# Allegro board EMBL51537_SC_BOARD.brd
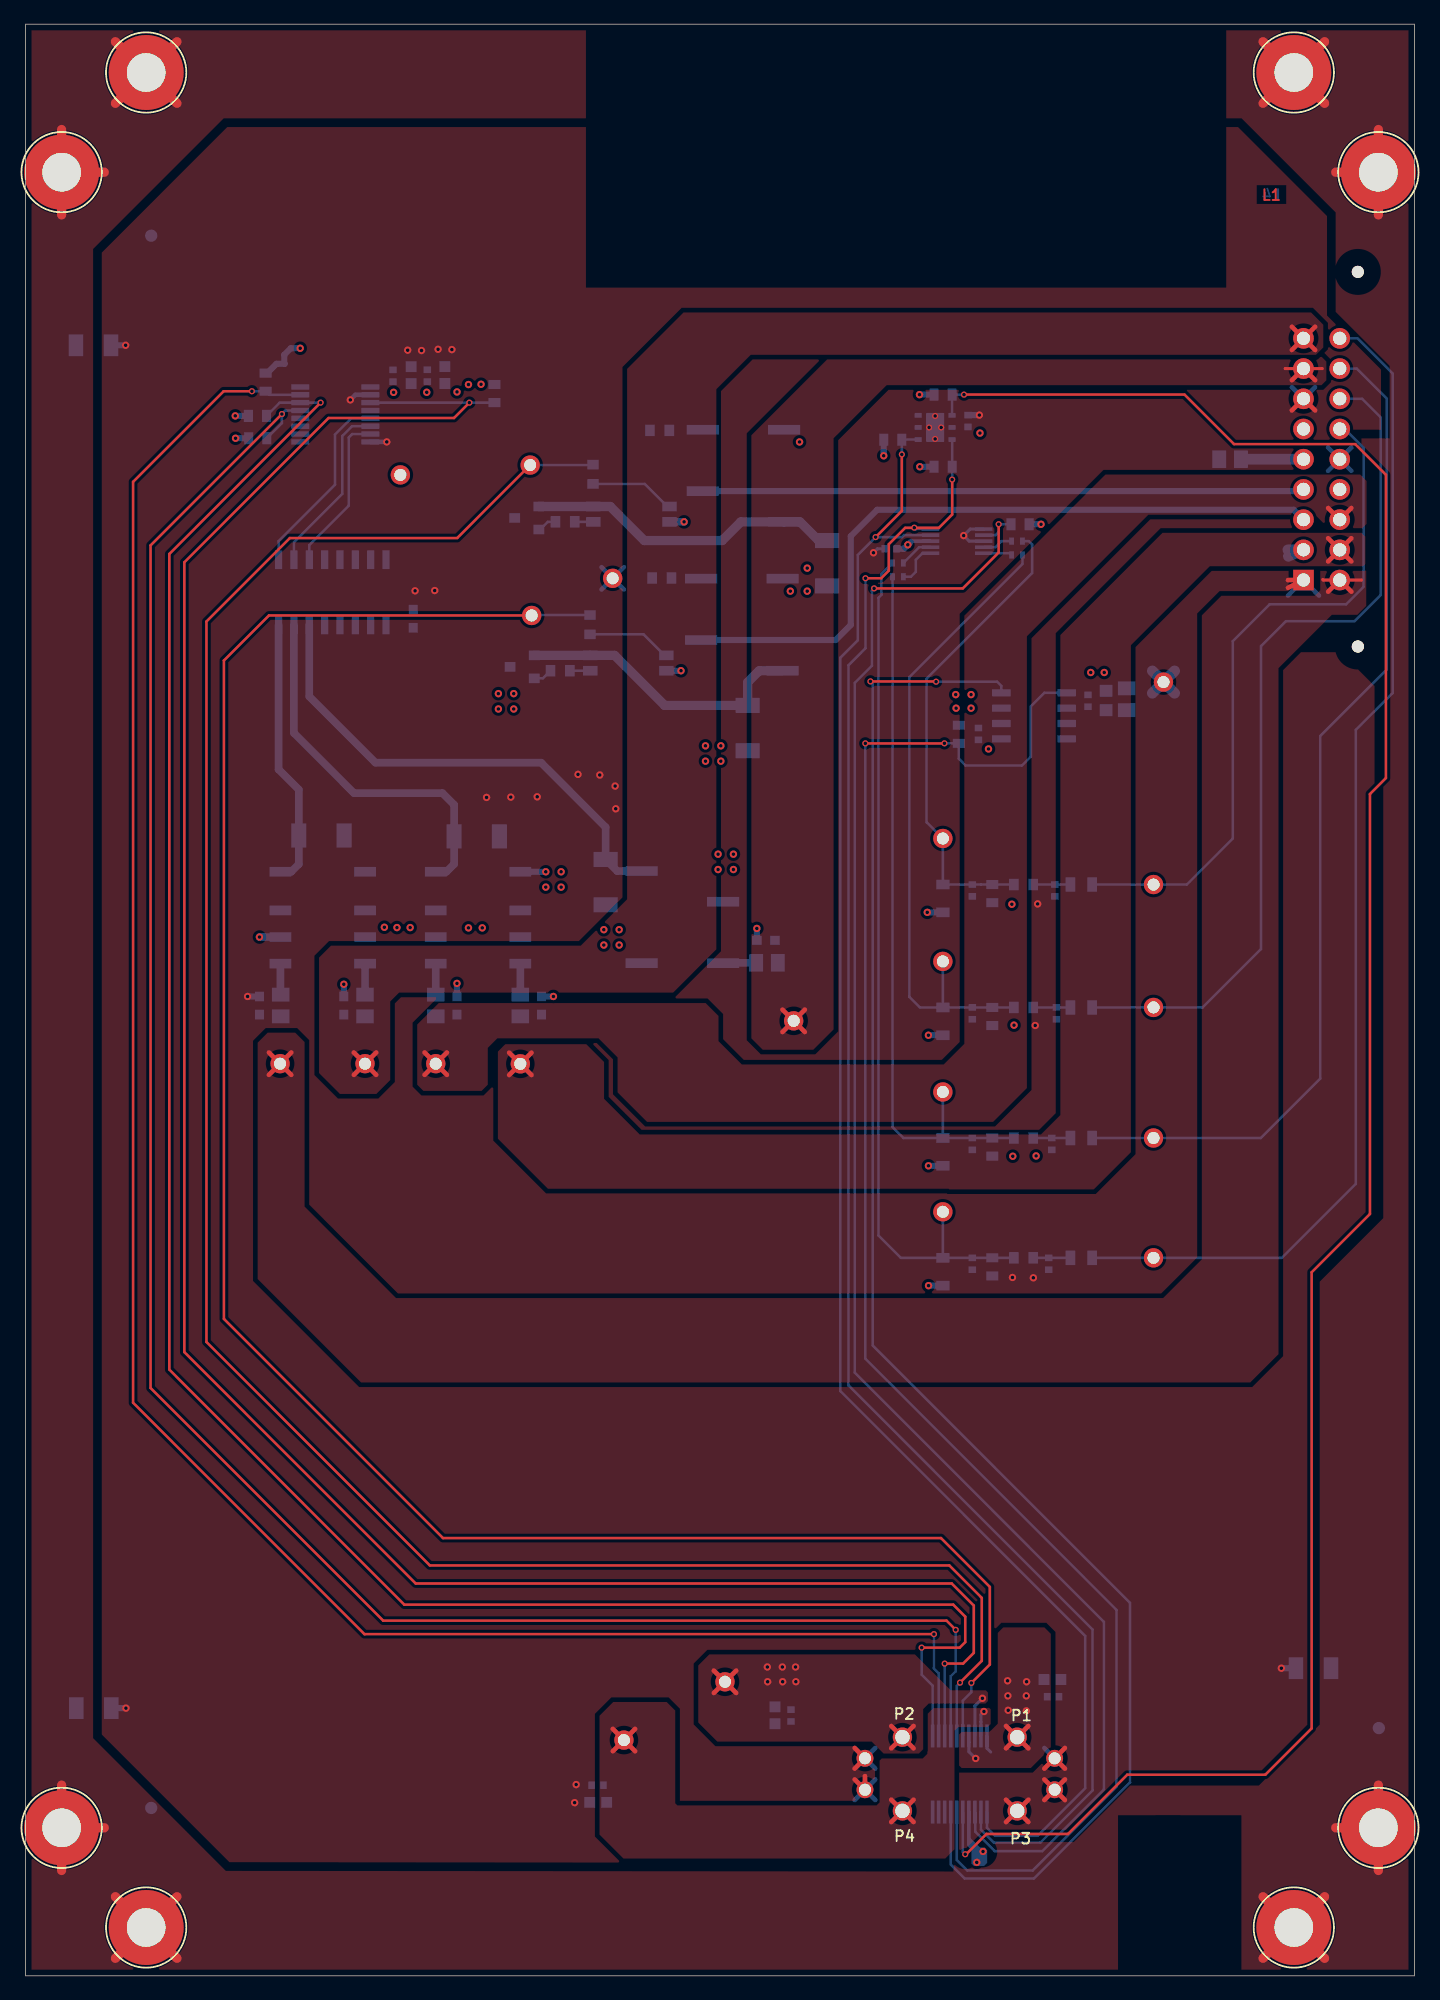
[diagram p0: board, top side]
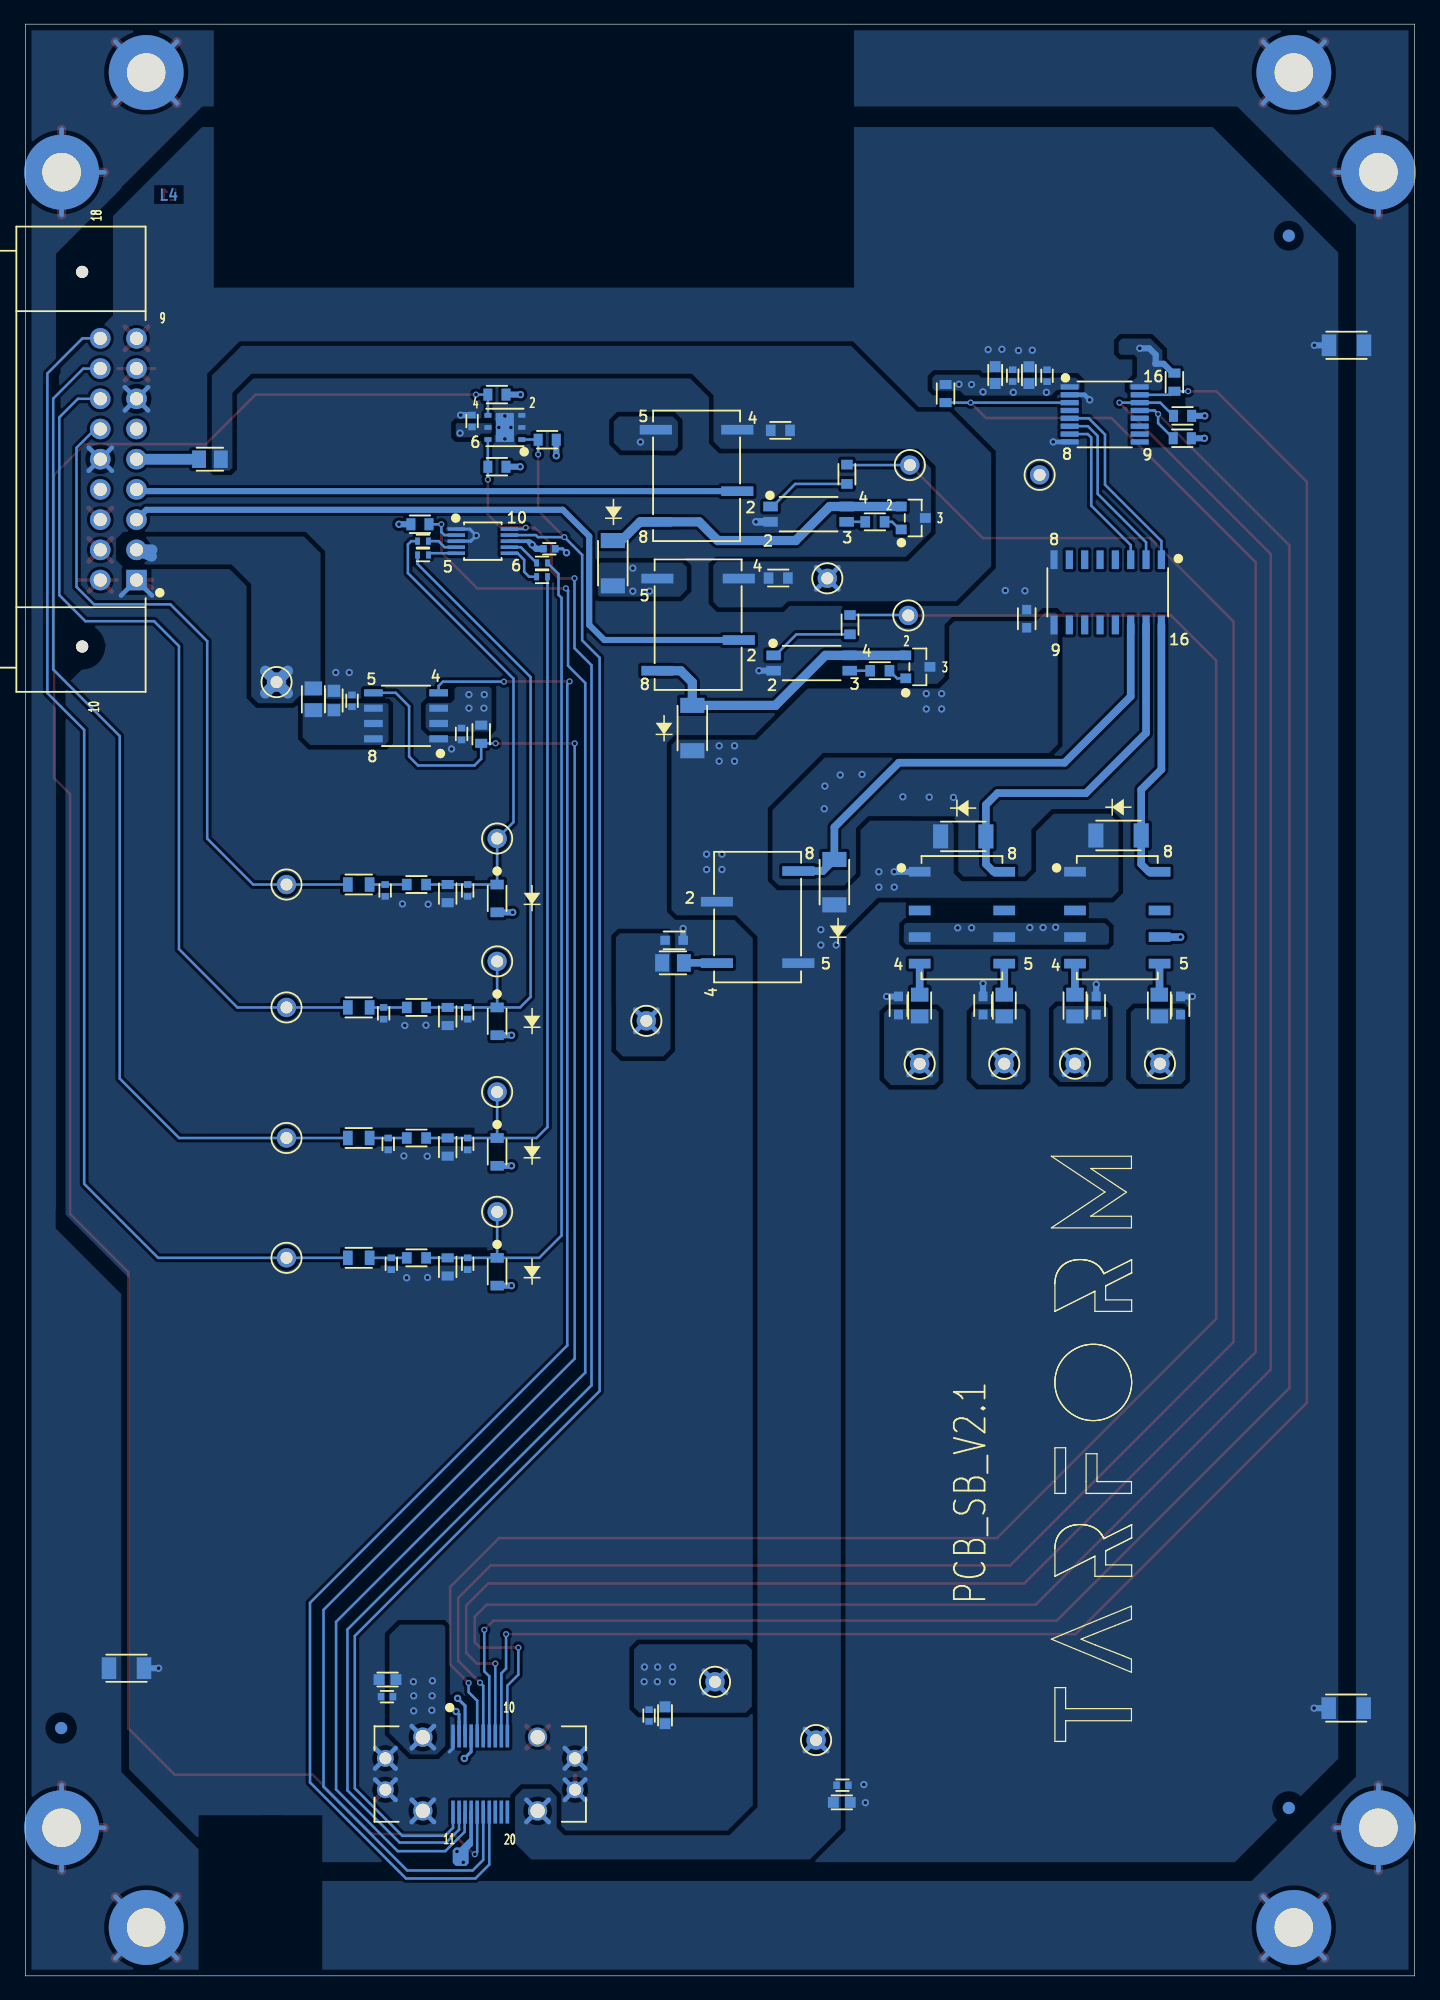
[diagram p1: board, bottom side, seen from below]

Outline 115 x 161.5 mm; copper layers: TOP, L2_PWR, L3_GND, BOTTOM. Coordinates in mm from the lower left corner of the outline.
Outline path: 0,161.5 0,0 115,0 115,161.5 0,161.5

## Design rules (mm)
constraint set DEFAULT: min track width 0.21
net group I2C_ANI0_IC: nets I2C_ANI0_IC N06583
net group I2C_ANI1_IC: nets I2C_ANI1_IC N06579
net group I2C_ANI2_IC: nets I2C_ANI2_IC N06575
net group I2C_ANI3_IC: nets I2C_ANI3_IC N06560
net group POWER: nets HV_GND ISO_RELAY1_IN1 ISO_RELAY2_IN1

## Placement (name value [footprint] x y rotation side)
C1  0.1uF  [CAPC1005X55N_A]  78.89 102.77 270 bottom
C2  0.1uF  [CAPC1005X55N_A]  87.96 105.51 90 bottom
C3  22uF  [CAPC1608X80N_A]  89.46 105.54 90 bottom
C4  0.1uF  [CAPC1005X55N_A]  30.43 132.41 90 bottom
C5  1uF  [CAPC1608X90N_A]  31.93 132.46 90 bottom
C6  0.1uF  [CAPC1608X90N]  32.11 112.3 270 bottom
C7  0.1uF  [CAPC1005X55N_A]  71.63 118.09 180 bottom
C8  0.1uF  [CAPC1005X55N_A]  78.03 128.66 90 bottom
C9  0.1uF  [CAPC1005X55N_A]  47.36 15.77 180 bottom
C10  1uF  [CAPC1608X90N_A]  47.42 14.35 180 bottom
C11  0.1uF  [CAPC1005X55N_A]  63.38 21.54 270 bottom
C12  1uF  [CAPC1608X90N_A]  62.05 21.56 270 bottom
C13  0.1uF  [CAPC1005X55N_A]  85.07 23.1 0 bottom
C14  1uF  [CAPC1608X90N_A]  85.02 24.52 0 bottom
C15  0.1uF  [CAPC1608X90N]  42.73 80.29 270 bottom
C16  0.1uF  [CAPC1608X90N]  35.73 80.29 270 bottom
C17  0.1uF  [CAPC1608X90N]  61.3 85.69 0 bottom
C18  0.1uF  [CAPC1005X55N_A]  85.22 89.82 270 bottom
C19  0.1uF  [CAPC1005X55N_A]  78.39 89.82 270 bottom
C20  0.1uF  [CAPC1005X55N_A]  85.35 79.65 270 bottom
C21  0.1uF  [CAPC1005X55N_A]  78.39 79.65 270 bottom
C22  DNP  [CAPC1005X55N_A]  84.96 68.84 270 bottom
C23  DNP  [CAPC1005X55N_A]  78.39 68.84 270 bottom
C24  DNP  [CAPC1005X55N_A]  84.71 58.92 270 bottom
C25  DNP  [CAPC1005X55N_A]  78.39 58.92 270 bottom
C26  0.1uF  [CAPC1608X90N]  26.36 80.29 270 bottom
C27  0.1uF  [CAPC1608X90N]  19.38 80.29 270 bottom
C30  1nF  [CAPC3216X180N_D]  5.64 134.93 0 bottom
C31  DNP  [CAPC3216X180N_D]  5.66 22.15 0 bottom
C32  DNP  [CAPC3216X180N_D]  106.63 25.46 180 bottom
C33  0.1uF  [CAPC1005X55N_A]  33.27 132.41 90 bottom
C34  1uF  [CAPC1608X90N_A]  34.72 132.47 90 bottom
D18  RRE07VTM6SFHTR  [SODFL2514X80N_2K]  75.95 89.15 270 bottom
D19  RRE07VTM6SFHTR  [SODFL2514X80N_2K]  75.95 78.99 270 bottom
D20  DNP  [SODFL2514X80N_2K]  75.95 68.18 270 bottom
D21  DNP  [SODFL2514X80N_2K]  75.95 58.26 270 bottom
D22  LL4148-GS08  [DIOMELF3515N]  59.79 103.26 90 bottom
D23  LL4148-GS08  [DIOMELF3515N]  66.37 116.9 90 bottom
D24  LL4148-GS08  [DIOMELF3515N]  24.51 94.37 180 bottom
D25  LL4148-GS08  [DIOMELF3515N]  37.36 94.29 180 bottom
D26  LL4148-GS08  [DIOMELF3515N]  48.03 90.5 90 bottom
J1  FX23-20S-0.5SV  [HIROSE_FX23-20S-0P5SV]  79.6 19.85 180 bottom
J2  MX23A18NF1  [JAE_MX23A18NF1]  105.8 115.5 270 bottom
L16  BLM21SP601SH1D  [INDC2012X105N]  99.73 125.5 0 bottom
L18  MPZ2012S102AT000  [FB_MPZ2012S300ATD25]  87.41 90.31 180 bottom
L19  MPZ2012S102AT000  [FB_MPZ2012S300ATD25]  87.41 80.14 180 bottom
L20  MPZ2012S102AT000  [FB_MPZ2012S300ATD25]  87.41 69.33 180 bottom
L21  MPZ2012S102AT000  [FB_MPZ2012S300ATD25]  87.41 59.41 180 bottom
L22  BLM21SP601SH1D  [INDC2012X105N]  91.16 105.64 90 bottom
L23  BLM21AG121SZ1D  [INDC2012X105N]  40.97 80.29 270 bottom
L24  BLM21AG121SZ1D  [INDC2012X105N]  33.97 80.29 270 bottom
L25  BLM21AG121SZ1D  [INDC2012X105N]  21.14 80.29 270 bottom
L26  BLM21AG121SZ1D  [INDC2012X105N]  28.12 80.29 270 bottom
L27  BLM21AG121SZ1D  [INDC2012X105N]  61.39 83.82 0 bottom
MH1  Mounting hole  [MTG320_620]  3 149.25 270 top
MH2  Mounting hole  [MTG320_620]  112 149.25 270 top
MH3  Mounting hole  [MTG320_620]  3 12.25 270 top
MH4  Mounting hole  [MTG320_620]  112 12.25 270 top
MH5  Mounting hole  [MTG320_620]  10 157.5 270 top
MH6  Mounting hole  [MTG320_620]  105 157.5 270 top
MH7  Mounting hole  [MTG320_620]  10 4 270 top
MH8  Mounting hole  [MTG320_620]  105 4 270 top
NOREF  -  []  86.1 20.65 0 top
NOREF#2  -  []  114.26 151.38 0 top
NOREF#3  -  []  12.26 159.63 0 top
NOREF#4  -  []  75.95 88 90 top
NOREF#5  -  []  0 161.5 0 top
NOREF#6  -  []  76.7 81.54 0 top
NOREF#7  -  []  62.81 120.32 90 top
NOREF#8  -  []  50.79 103.81 0 top
NOREF#9  -  []  3 12.25 90 top
NOREF#10  -  []  78.8 59.31 90 top
NOREF#11  -  []  66.51 106.41 90 top
NOREF#12  -  []  114.26 14.37 0 top
NOREF#13  -  []  21.12 83.76 0 top
NOREF#14  -  []  75.1 13.55 0 top
NOREF#15  -  []  70.66 126.58 90 top
NOREF#16  -  []  75.95 57.11 90 top
NOREF#17  -  []  27.97 92.66 0 top
NOREF#18  -  []  55.71 113.61 0 top
NOREF#19  -  []  86.1 12.75 90 top
NOREF#20  -  []  51.02 83.8 90 top
NOREF#21  -  []  85.2 15.4 90 top
NOREF#22  -  []  72.6 13.65 0 top
NOREF#23  -  []  108.8 125.5 0 top
NOREF#24  -  []  123.05 98.6 90 top
NOREF#25  -  []  56.07 122.86 90 top
NOREF#26  -  []  78.8 80.04 90 top
NOREF#27  -  []  21.12 83.76 90 top
NOREF#28  -  []  33.97 88.16 90 top
NOREF#29  -  []  104.35 108.25 0 top
NOREF#30  -  []  12.26 6.12 0 top
NOREF#31  -  []  21.27 92.66 90 top
NOREF#32  -  []  132.5 119.75 0 top
NOREF#33  -  []  33.97 83.76 0 top
NOREF#34  -  []  78.8 69.23 90 top
NOREF#35  -  []  70.66 126.58 0 top
NOREF#36  -  []  76.7 70.73 0 top
NOREF#37  -  []  40.82 92.66 0 top
NOREF#38  -  []  76.7 60.81 0 top
NOREF#39  -  []  75.95 67.03 90 top
NOREF#40  -  []  34.12 92.66 0 top
NOREF#41  -  []  76.7 91.7 0 top
NOREF#42  -  []  73.91 127.13 90 top
NOREF#43  -  []  105.8 125.5 90 top
NOREF#44  -  []  78.8 90.21 90 top
NOREF#45  -  []  21.27 92.66 0 top
NOREF#46  -  []  50.79 93.01 90 top
NOREF#47  -  []  55.94 110.54 90 top
NOREF#48  -  []  62.68 108 90 top
NOREF#49  -  []  112 12.25 90 top
NOREF#50  -  []  75.95 77.83 90 top
NOREF#51  -  []  62.68 108 90 top
NOREF#52  -  []  10 4 90 top
NOREF#53  -  []  62.81 120.32 90 top
NOREF#54  -  []  33.97 83.76 90 top
NOREF#55  -  []  55.84 125.93 0 top
NOREF#56  -  []  57.76 88.88 90 top
NOREF#57  -  []  110.3 110 90 top
NOREF#58  -  []  105.05 144.75 0 top
NOREF#59  -  []  115 0 90 top
NOREF#60  -  []  73.91 129.13 0 top
NOREF#61  -  []  72.6 13.65 90 top
NOREF#62  -  []  21.12 85.96 90 top
NOREF#63  -  []  5.26 151.38 0 top
NOREF#64  -  []  57.76 83.8 90 top
NOREF#65  -  []  75.1 13.55 90 top
NOREF#66  -  []  138.85 108.25 90 top
NOREF#67  -  []  78.6 19.85 0 top
NOREF#68  -  []  21.12 88.16 90 top
NOREF#69  -  []  107.26 159.63 0 top
NOREF#70  -  []  108.8 135.5 90 top
NOREF#71  -  []  34.12 92.66 90 top
NOREF#72  -  []  5.26 14.37 0 top
NOREF#73  -  []  33.97 85.96 90 top
NOREF#74  -  []  107.26 6.12 0 top
NOREF#75  -  []  10 157.5 0 top
NOREF#76  -  []  105.8 128 90 top
NOREF#77  -  []  66.64 118.73 90 top
NOREF#78  -  []  77.35 16.7 0 top
NOREF#79  -  []  3 149.25 0 top
NOREF#80  -  [unnamed#2]  10.42 144 262.9 bottom
NOREF#81  -  [unnamed#2]  112.04 20.5 183.8 bottom
NOREF#82  -  [unnamed#2]  10.42 13.89 262.9 bottom
Q1  TLX9000(TPL,F  [OPTO_TLP293_BL-TPL_E]  49.91 108.63 270 bottom
Q2  TLX9000(TPL,F  [OPTO_TLP293_BL-TPL_E]  50.17 120.95 270 bottom
Q3  MMBT3904-TP  [SOT95P237X122-3N_OSI]  41.12 108.32 270 bottom
Q4  MMBT3904-TP  [SOT95P237X122-3N_OSI]  41.5 120.64 270 bottom
R1  DNP  [RESC1608X55N_B]  77.27 102.74 270 bottom
R2  10K  [RESC1608X55N_B]  19.21 129.09 0 bottom
R3  10K  [RESC1608X55N_B]  19.89 131.87 270 bottom
R8  10K  [RESC1608X55N_B]  71.8 127.11 0 bottom
R9  10K  [RESC1608X55N_B]  75.97 124.88 0 bottom
R10  10K  [RESC1608X55N_B]  82.34 120.12 180 bottom
R11  0E  [RESC1005X40N_A]  82.09 118.72 0 bottom
R12  0E  [RESC1005X40N_A]  82.09 117.58 0 bottom
R13  0E  [RESC1005X40N_A]  72.23 115.78 180 bottom
R14  0E  [RESC1005X40N_A]  72.23 116.92 180 bottom
R15  10K  [RESC1608X55N_B]  75.97 130.85 180 bottom
R16  DNP  [RESC1608X55N_A]  52.5 127.89 180 bottom
R17  1k  [RESC1608X55N_A]  46.74 111.81 90 bottom
R18  DNP  [RESC1608X55N_A]  52.68 115.67 0 bottom
R19  1k  [RESC1608X55N_A]  46.99 124.25 90 bottom
R28  10K  [RESC1608X55N_B]  19.23 127.24 0 bottom
R29  10K  [RESC1608X55N_B]  38.83 130.93 270 bottom
R30  47K  [RESC1608X55N_A]  82.63 90.31 180 bottom
R31  10K  [RESC1608X55N_B]  80.04 89.56 270 bottom
R32  47K  [RESC1608X55N_A]  82.63 80.14 180 bottom
R33  10K  [RESC1608X55N_B]  80.04 79.39 270 bottom
R34  DNP  [RESC1608X55N_A]  82.63 69.33 180 bottom
R35  DNP  [RESC1608X55N_B]  80.04 68.58 270 bottom
R36  DNP  [RESC1608X55N_A]  82.63 59.41 180 bottom
R37  DNP  [RESC1608X55N_B]  80.04 58.66 270 bottom
R38  1k2  [RESC1608X55N_A]  44.27 108 0 bottom
R39  1k2  [RESC1608X55N_A]  44.68 120.32 0 bottom
TP1  T POINT R  [TPC160H100]  94.21 107.06 180 bottom
TP2  T POINT R  [TPC160H100]  57.91 24.33 180 bottom
TP3  T POINT R  [TPC160H100]  49.55 19.51 90 bottom
TP4  T POINT R  [TPC160H100]  31.04 124.2 180 bottom
TP5  T POINT R  [TPC160H100]  28.12 75.48 180 bottom
TP6  T POINT R  [TPC160H100]  40.97 75.47 180 bottom
TP7  T POINT R  [TPC160H100]  63.6 79.03 270 bottom
TP8  T POINT R  [TPC160H100]  21.08 75.48 0 bottom
TP9  T POINT R  [TPC160H100]  33.97 75.48 0 bottom
TP10  T POINT R  [TPC160H100]  93.39 90.31 180 bottom
TP11  T POINT R  [TPC160H100]  93.39 80.14 180 bottom
TP12  T POINT R  [TPC160H100]  93.39 69.33 180 bottom
TP13  T POINT R  [TPC160H100]  93.39 59.41 180 bottom
TP14  T POINT R  [TPC160H100]  75.95 94.12 180 bottom
TP15  T POINT R  [TPC160H100]  75.95 83.95 180 bottom
TP16  T POINT R  [TPC160H100]  75.95 73.14 180 bottom
TP17  T POINT R  [TPC160H100]  75.95 63.22 180 bottom
TP18  T POINT R  [TPC160H100]  48.62 115.64 180 bottom
TP19  T POINT R  [TPC160H100]  41.91 112.57 180 bottom
TP20  T POINT R  [TPC160H100]  41.79 125.02 180 bottom
U1  TPS2024IDRQ1  [SOIC127P600X175-8N_TI]  83.49 104.27 90 bottom
U2  TCA6408AQPWRQ1  [TSSOP65P640X120-16N_B]  25.66 129.21 180 bottom
U3  G6K-2F-Y-DC12  [RELAY_G6K-2F-Y-DC12]  24.62 87.56 270 bottom
U4  G6K-2F-Y-DC12  [RELAY_G6K-2F-Y-DC12]  37.47 87.56 270 bottom
U5  TPL7407LADR  [SOIC127P600X175-16N_TI]  25.41 114.48 0 bottom
U6  G6L-1F-DC12  [RELAY_G6L-1F-DC12]  54.39 87.61 270 bottom
U11  ADS1015IDGSR  [VSSOP50P490X110-10N]  77.13 118.72 180 bottom
U12  HDC2021DEBT  [WSON100P300X300X92-7N]  75.31 128.13 0 bottom
U13  G6L-1F-DC12  [RELAY_G6L-1F-DC12]  59.31 111.81 90 bottom
U14  G6L-1F-DC12  [RELAY_G6L-1F-DC12]  59.44 124.13 90 bottom

## Library data of the parts
C1 C2 C4 C7-C9 C11 C13 C18-C25 C33 = CAP_NP_78: tolerance: 10%; signal model: DEFAULT_CAPACITOR_100000pF_2_1
C3 C6 C15-C17 C26 C27 = CAP_NP_78: signal model: DEFAULT_CAPACITOR_100000pF_2_1
C5 C10 C12 C14 C34 = CAP NP
C30-C32 = CAPACITOR NON-POL
D18-D21 = DIODE SCHOTTKY
D22-D26 = DIODE PIN_1
J1 = CONN PCB 12x2-P_1
J2 = MX23A18NF1_0
L16 L18-L27 = L-33R100MHz-3A-25%-0603
MH1-MH8 = Mounting hole
Q1 Q2 = TLX9000TPLF_1
Q3 Q4 = NPN BCE
R1-R3 R8-R10 R15 R28-R37 = R_0
R11-R14 = RES_57: signal model: DEFAULT_RESISTOR_0.001OHM_2_1
R16-R19 R38 R39 = RES_57
TP1-TP20 = T POINT R
U1 = TPS2024IDRQ1_0
U2 = TCA6408AQPWRQ1_1
U3 U4 = Relay_DPDT_nb_0
U5 = TPL7407LADR_0
U6 U13 U14 = Relay_SPDT_b_0
U11 = ADS1015IDGSR_1
U12 = HDC2021DEBT_2

## Footprints (pads in the part's own frame, mm; a bottom-side part is the same pattern mirrored in y, then rotated)
CAPC1005X55N_A
  rect 0.55x0.62 smd: 1(-0.49,0) 2(0.49,0)
CAPC1608X80N_A
  rect 1x1.05 smd: 1(-0.8,0) 2(0.8,0)
CAPC1608X90N
  rect 0.8x0.75 smd: 1(-0.75,0) 2(0.75,0)
CAPC1608X90N_A
  rect 0.9x0.9 smd: 1(-0.7,0) 2(0.7,0)
CAPC3216X180N_D
  rect 1.2x1.8 smd: 1(-1.45,0) 2(1.45,0)
DIOMELF3515N
  rect 1.25x2 smd: 1(-1.875,0) 2(1.875,0)
FB_MPZ2012S300ATD25
  rect 0.8x1.2 smd: 1(-0.9,0) 2(0.9,0)
HIROSE_FX23-20S-0P5SV
  rect 0.3x1.9 smd: 1(0,0) 2(0.5,0) 3(1,0) 4(1.5,0) 5(2,0) 6(2.5,0) 7(3,0) 8(3.5,0) 9(4,0) 10(4.5,0) 11(0,-6.3) 12(0.5,-6.3) 13(1,-6.3) 14(1.5,-6.3) 15(2,-6.3) 16(2.5,-6.3) 17(3,-6.3) 18(3.5,-6.3) 19(4,-6.3) 20(4.5,-6.3)
  round 1.6 hole 1.2: P1(-2.5,-0.1) P2(7,-0.1) P3(-2.5,-6.2) P4(7,-6.2)
  round 1.4 hole 1: SH1(-5.6,-1.85) SH2(10.1,-1.85) SH3(-5.6,-4.45) SH4(10.1,-4.45)
INDC2012X105N
  rect 1.15x1.45 smd: 1(-0.9,0) 2(0.9,0)
JAE_MX23A18NF1
  round 1 hole 3.2 unplated: (-25.5,-4.5) (5.5,-4.5)
  rect 1.7x1.7 hole 1.1: 1(0,0)
  round 1.71 hole 1.1: 2(-2.5,0) 3(-5,0) 4(-7.5,0) 5(-10,0) 6(-12.5,0) 7(-15,0) 8(-17.5,0) 9(-20,0) 10(0,-3) 11(-2.5,-3) 12(-5,-3) 13(-7.5,-3) 14(-10,-3) 15(-12.5,-3) 16(-15,-3) 17(-17.5,-3) 18(-20,-3)
MTG320_620
  round 6.2 hole 3.2: 1(0,0)
OPTO_TLP293_BL-TPL_E
  rect 0.8x1.2 smd: 1(-0.635,-3.15) 2(0.635,-3.15) 3(0.635,3.15) 4(-0.635,3.15)
RELAY_G6K-2F-Y-DC12
  rect 0.8x1.8 smd: 1(-3.8,-3.5) 2(-0.6,-3.5) 3(1.6,-3.5) 4(3.8,-3.5) 5(3.8,3.5) 6(1.6,3.5) 7(-0.6,3.5) 8(-3.8,3.5)
RELAY_G6L-1F-DC12
  rect 0.8x2.66 smd: 2(-1.27,-3.37) 4(3.81,-3.37) 5(3.81,3.37) 8(-3.81,3.37)
RESC1005X40N_A
  rect 0.4x0.6 smd: 1(-0.45,0) 2(0.45,0)
RESC1608X55N_A
  rect 0.8x0.95 smd: 1(-0.8,0) 2(0.8,0)
RESC1608X55N_B
  rect 0.75x1 smd: 1(-0.75,0) 2(0.75,0)
SODFL2514X80N_2K
  rect 0.8x1.1 smd: 1(-1.15,0) 2(1.15,0)
SOIC127P600X175-8N_TI
  custom 0.6x1.55 smd: 1(-1.905,-2.7) 2(-0.635,-2.7) 3(0.635,-2.7) 4(1.905,-2.7) 5(1.905,2.7) 6(0.635,2.7) 7(-0.635,2.7) 8(-1.905,2.7)
SOIC127P600X175-16N_TI
  rect 0.6x1.55 smd: 1(-4.445,-2.7) 2(-3.175,-2.7) 3(-1.905,-2.7) 4(-0.635,-2.7) 5(0.635,-2.7) 6(1.905,-2.7) 7(3.175,-2.7) 8(4.445,-2.7) 9(4.445,2.7) 10(3.175,2.7) 11(1.905,2.7) 12(0.635,2.7) 13(-0.635,2.7) 14(-1.905,2.7) 15(-3.175,2.7) 16(-4.445,2.7)
SOT95P237X122-3N_OSI
  rect 0.8x0.9 smd: 1(0.95,-1) 2(-0.95,-1) 3(0,1)
TPC160H100
  round 1.6 hole 1: 1(0,0)
TSSOP65P640X120-16N_B
  custom 1.5x0.45 smd: 1(-2.9,2.275) 2(-2.9,1.625) 3(-2.9,0.975) 4(-2.9,0.325) 5(-2.9,-0.325) 6(-2.9,-0.975) 7(-2.9,-1.625) 8(-2.9,-2.275) 9(2.9,-2.275) 10(2.9,-1.625) 11(2.9,-0.975) 12(2.9,-0.325) 13(2.9,0.325) 14(2.9,0.975) 15(2.9,1.625) 16(2.9,2.275)
unnamed#2
  round 1.016 smd: (0,0)
VSSOP50P490X110-10N
  rect 1.45x0.3 smd: 1(-2.2,1) 2(-2.2,0.5) 3(-2.2,0) 4(-2.2,-0.5) 5(-2.2,-1) 6(2.2,-1) 7(2.2,-0.5) 8(2.2,0) 9(2.2,0.5) 10(2.2,1)
WSON100P300X300X92-7N
  custom 0.6x0.4 smd: 1(-1.4,1) 2(-1.4,0) 3(-1.4,-1) 4(1.4,-1) 5(1.4,0) 6(1.4,1)
  custom 1.5x2.4 smd: 7(0,0)

## Nets
12V_START1: J1.14 J2.6
+5V USB: J2.2 L22.2 TP1.1(TP)
GND: C1.2 C2.2 C3.2 C4.2 C5.2 C6.1 C7.2 C8.2 C9.2 C10.2 C11.2 C12.2 C13.2 C14.2 C15.1 C16.1 C17.1 C18.2 C19.2 C20.2 C21.2 C22.2 C23.2 C24.2 C25.2 C26.1 C27.1 C30.2 C31.2 C32.2 C33.2 C34.2 J1.1 J1.P3 J1.SH1 J1.SH2 J1.SH3 J1.SH4 J2.1 J2.7 J2.14 Q1.2 Q2.2 Q3.3(E) Q4.3(E) R31.2 R33.2 R35.2 R37.2 U1.1 U2.2 U2.8 U5.8 U11.1 U11.3 U12.2 U12.3 U12.7
VDD1: C6.2 C9.1 C10.1 D22.1(K) D23.1(K) D24.1(K) D25.1(K) D26.1(K) J1.2 J1.P4 TP3.1(TP) U3.1 U4.1 U5.9 U6.2 U6.5 U13.5 U14.5
VDD2: C1.1 C11.1 C12.1 J1.3 J1.P2 R1.1 TP2.1(TP) U1.2 U1.3 U3.3 U4.3 U4.6
VDD3: C4.1 C5.1 C7.1 C8.1 C13.1 C14.1 C33.1 C34.1 D18.2(CATHODE) D19.2(CATHODE) D20.2(CATHODE) D21.2(CATHODE) J1.4 J1.P1 R2.1 R3.1 R8.1 R9.1 R10.1 R15.2 R28.1 R29.1 TP4.1(TP) U2.1 U2.16(VCCP) U3.6 U11.8(VDD) U12.5(VDD)
CHASSIS_GND: C30.1 C31.1 C32.1 MH1.1 MH2.1 MH3.1 MH4.1 MH5.1 MH6.1 MH7.1 MH8.1
DM_RELAY_1: J1.5 R17.2 TP19.1(TP)
DM_RELAY_2: J1.6 R19.2 TP20.1(TP)
HV_GND: L16.1 R16.1 R16.2 R18.1 R18.2 TP18.1(TP) U13.4(NO) U14.4(NO)
I2C2_SCL: J1.10 R2.2 U2.14
I2C2_SDA: J1.9 R3.2 U2.15
I2C3_SCL: J1.12 R9.2 U11.10 U12.6
I2C3_SDA: J1.11 R8.2 U11.9 U12.1
I2C_ADC_RDY: J1.13 R10.2 U11.2
I2C_ANI0: J2.15 L18.1 TP10.1(TP)
I2C_ANI0_IC: C19.1 D18.1 R11.2 R30.2 R31.1 TP14.1(TP)
I2C_ANI1: J2.16 L19.1 TP11.1(TP)
I2C_ANI1_IC: C21.1 D19.1 R12.2 R32.2 R33.1 TP15.1(TP)
I2C_ANI2: J2.17 L20.1 TP12.1(TP)
I2C_ANI2_IC: C23.1 D20.1 R13.2 R34.2 R35.1 TP16.1(TP)
I2C_ANI3: J2.18 L21.1 TP13.1(TP)
I2C_ANI3_IC: C25.1 D21.1 R14.2 R36.2 R37.1 TP17.1(TP)
I2C_THS_INT: J1.15 R15.1 U12.4
IOEXP_INT: J1.7 R28.2 U2.13
IOEXP_RESET: J1.8 R29.2 U2.3
ISO_RELAY1_IN1: J2.3 U13.2
ISO_RELAY2_IN1: J2.4 U14.2
RELAY1_OUT1: C26.2 J2.9 L26.2 TP5.1(TP)
RELAY1_OUT2: C27.2 J2.10 L25.2 TP8.1(TP)
RELAY2_OUT1: C15.2 J2.11 L23.2 TP6.1(TP)
RELAY2_OUT2: C16.2 J2.12 L24.2 TP9.1(TP)
RELAY3_OUT1: C17.2 J2.8 L27.2 TP7.1(TP)
RELAY_1: D24.2 U3.8 U5.16
RELAY_2: D25.2 U4.8 U5.15
RELAY_3: D26.2 U5.14 U6.8
USB_EN: J1.17 U1.4
USB_OC: J1.16 R1.2 U1.5
N03287: U2.5 U5.1
N03291: U2.6 U5.2
N03295: U2.7 U5.3
N06560: R14.1 U11.7
N06575: R13.1 U11.6
N06579: R12.1 U11.5
N06583: R11.1 U11.4
N07201: L26.1 U3.4
N07205: L25.1 U3.5(N4)
N07536: L23.1 U4.4
N07541: L24.1 U4.5(N4)
N08317: L27.1 U6.4(NO)
N13136: C2.1 C3.1 L22.1 U1.6 U1.7 U1.8(OUT3)
N15818: D22.2 Q1.4 Q3.2 U13.8
N16558: Q1.1 R17.1
N17913: Q2.1 R19.1
N17917: D23.2 Q2.4 Q4.2 U14.8
N410547: C18.1 L18.2 R30.1
N411738: C20.1 L19.2 R32.1
N412167: C22.1 L20.2 R34.1
N412611: C24.1 L21.2 R36.1
N637569: J2.5 L16.2
N652017: Q1.3 R38.2
N652047: Q2.3 R39.2
N652154: Q4.1 R39.1
N652754: Q3.1 R38.1

Pads without a net: J1 18 19 20; J2 13; U2 4 9 10 11 12; U3 2 7; U4 2 7; U5 4 5 6 7 10 11 12 13

## Via types
v1: diameter 0.508, hole 0.305, TOP to BOTTOM, 27 vias
v2: diameter 0.61, hole 0.305, TOP to BOTTOM, 110 vias

## Routing (per net, layer and track width the routed paths; a pad name or vN(x,y) marks a point on that pad's centre or on a via; arc(x,y) is an arc through that point)
12V_START1: length 5.4
  L2_PWR w0.381: 104.84,128.96 J2.6 ; J2.6 104.84,127.04 ; J2.6 106.76,128.96 ; J2.6 106.76,127.04
  vias: v2(78.76,9.39) v2(79.27,10.29)
+5V USB: length 7.9
  BOTTOM w0.889: 93.29,107.98 TP1.1 ; TP1.1 93.29,106.14 ; TP1.1 95.13,106.14 ; TP1.1 95.13,107.98 ; 104.55,117.47 J2.2 104.51,118
GND: length 123.8
  TOP w0.381: 84.35,17.15 J1.SH1 ; J1.SH1 86.05,18.85 ; J1.SH1 86.05,17.15 ; 84.35,16.25 J1.SH3 ; J1.SH3 86.05,14.55 ; J1.SH3 84.35,14.55 ; J1.SH3 86.05,16.25 ; 104.52,115.5 J2.1 104.52,114.86 ; 69.5,16.53 J1.SH4 68.65,16.25 ; 68.65,18.85 J1.SH2 68.65,17.15 ; 81.18,12.73 J1.P3 ; J1.P3 81.18,14.57 ; J1.P3 83.02,14.57 ; J1.P3 83.02,12.73 ; 104.84,129.54 J2.7 106.76,129.54
  L3_GND w0.381: 68.65,18.85 J1.SH2 ; J1.SH2 70.35,18.85 ; J1.SH2 68.65,17.15 ; J1.SH2 70.35,17.15 ; J1.SH3 86.05,14.55 ; J1.SH3 86.05,16.25 ; J1.SH3 84.35,14.55 ; J1.SH3 84.35,16.25 ; J1.SH1 86.05,17.15 ; J1.SH1 84.35,17.15 ; J1.SH1 84.35,18.85 ; J1.SH1 86.05,18.85 ; J2.1 106.76,116.46 ; J2.1 106.76,114.54 ; J2.1 104.84,114.54 ; J2.1 104.84,116.46 ; J1.SH4 70.35,14.55 ; J1.SH4 68.65,16.25 ; J1.SH4 70.35,16.25 ; J1.SH4 68.65,14.55 ; 107.84,126.46 J2.14 ; J2.14 107.84,124.54 ; J2.14 109.76,126.46 ; J2.14 109.76,124.54 ; 81.18,12.73 J1.P3 ; J1.P3 81.18,14.57 ; J1.P3 83.02,12.73 ; J1.P3 83.02,14.57 ; J2.7 106.76,131.46 ; J2.7 104.84,131.46 ; J2.7 106.76,129.54 ; J2.7 104.84,129.54
  BOTTOM w0.254: 79.91,18.52 79.6,18.83 J1.1 ; U11.1 78.21,119.72 v2(77.67,119.18) 78.13,118.72 U11.3 ; v2(70.21,117.76) 70.54,118.09 C7.2
  BOTTOM w0.381: 81.18,12.73 J1.P3 ; J1.P3 81.18,14.57 ; J1.P3 83.02,14.57 ; J1.P3 83.02,12.73 ; J1.SH2 70.35,18.85 ; J1.SH2 68.65,17.15 ; J1.SH2 70.35,17.15 ; J1.SH2 68.65,18.85 ; 84.35,18.85 J1.SH1 ; J1.SH1 86.05,17.15 ; J1.SH1 84.35,17.15 ; J1.SH1 86.05,18.85 ; 104.84,129.54 J2.7 ; J2.7 104.84,131.46 ; J2.7 106.76,131.46 ; J2.7 106.76,129.54 ; J1.SH4 70.35,14.55 ; J1.SH4 68.65,16.25 ; J1.SH4 70.35,16.25 ; J1.SH4 68.65,14.55 ; 84.35,16.25 J1.SH3 ; J1.SH3 84.35,14.55 ; J1.SH3 86.05,16.25 ; 107.08,114.22 J2.1 104.52,114.22 ; U2.8 v2(29.92,126.93) ; 107.84,124.54 J2.14 ; J2.14 109.76,126.46 ; J2.14 109.76,124.54 ; J2.14 107.84,126.46 ; U2.2 27.32,130.83 v2(26.9,130.41)
  BOTTOM w0.508: C16.1 v2(35.73,82.12) ; C17.1 v2(60.55,86.67) ; C27.1 v2(18.4,81.04) ; C26.1 v2(26.36,82.05) ; C30.2 v2(8.3,134.93) ; Q1.2 v2(54.27,108) ; C15.1 v2(43.71,81.04) ; C8.2 v2(78.97,129.15) ; C32.2 v2(103.97,25.46) ; C31.2 v2(8.32,22.15)
  BOTTOM w0.635: v2(54.53,120.32) Q2.2
  vias: v1(74.81,128.13) v1(75.31,129.08) v1(75.31,127.18) v1(75.81,128.13) v2(31.65,134.52) v2(32.26,114.61) v2(32.79,134.5) v2(33.88,114.63) v2(34.16,134.6) v2(35.31,134.57) v2(38.18,97.52) v2(40.18,97.54) v2(42.37,97.57) v2(45.47,14.33) v2(45.59,15.83) v2(45.75,99.42) v2(47.55,99.37) v2(48.82,98.45) v2(48.87,96.58) v2(79.73,101.52) v2(81.66,88.68) v2(81.74,67.82) v2(81.71,57.79) v2(81.84,78.67) v2(83.44,57.76) v2(83.59,78.64) v2(83.67,67.85) v2(83.79,88.7) v2(88.19,107.85) v2(89.31,107.85)
VDD1: length 25.1
  TOP w0.381: 48.63,20.43 TP3.1 ; TP3.1 48.63,18.59 ; TP3.1 50.47,18.59 ; TP3.1 50.47,20.43 ; J1.P4 73.52,12.73 ; J1.P4 71.68,14.57 ; J1.P4 73.52,14.57 ; J1.P4 71.68,12.73
  BOTTOM w0.254: v2(79.35,21.87) 79.1,21.63 79.1,21.01 J1.2
  BOTTOM w0.381: 48.63,18.59 TP3.1 ; TP3.1 50.47,20.43 ; TP3.1 48.63,20.43 ; TP3.1 50.47,18.59 ; J1.P4 73.52,12.73 ; J1.P4 71.68,12.73 ; J1.P4 73.52,14.57 ; J1.P4 71.68,14.57
  BOTTOM w0.508: U4.1 v2(43.08,91.36)
  vias: v2(39.15,106.1) v2(39.15,104.83) v2(40.42,106.1) v2(40.42,104.83) v2(43.08,90.09) v2(44.35,91.36) v2(44.35,90.09) v2(47.88,86.57) v2(47.88,85.3) v2(49.15,86.57) v2(49.15,85.3) v2(56.3,101.78) v2(56.3,100.51) v2(57.34,92.82) v2(57.34,91.55) v2(57.57,101.78) v2(57.57,100.51) v2(58.61,92.82) v2(58.61,91.55) v2(63.32,114.58) v2(64.08,126.93) v2(64.72,116.49) v2(64.72,114.58)
VDD2: length 29.4
  TOP w0.381: TP2.1 58.84,23.41 ; TP2.1 56.99,23.41 ; TP2.1 58.84,25.25 ; TP2.1 56.99,25.25 ; 71.68,20.67 J1.P2 ; J1.P2 73.52,20.67 ; J1.P2 73.52,18.83 ; J1.P2 71.68,18.83
  L2_PWR w0.381: 56.99,25.25 TP2.1 ; TP2.1 58.84,23.41 ; TP2.1 58.84,25.25 ; TP2.1 56.99,23.41 ; J1.P2 73.52,20.67 ; J1.P2 73.52,18.83 ; J1.P2 71.68,20.67 ; J1.P2 71.68,18.83
  BOTTOM w0.254: J1.3 78.6,20.43 78.6,22.34 v2(79.22,22.97)
  BOTTOM w0.381: TP2.1 58.84,23.41 ; TP2.1 58.84,25.25 ; TP2.1 56.99,23.41 ; TP2.1 56.99,25.25
  vias: v2(29.72,86.77) v2(30.76,86.75) v2(31.85,86.75) v2(36.68,86.72) v2(37.82,86.72) v2(61.42,25.56) v2(61.44,24.34) v2(62.66,25.56) v2(62.69,24.34) v2(63.75,25.56) v2(63.78,24.34) v2(77.01,106.02) v2(77.04,104.9) v2(78.28,106.02) v2(78.28,104.9)
VDD3: length 43.7
  TOP w0.381: 81.18,20.67 J1.P1 ; J1.P1 83.02,20.67 ; J1.P1 81.18,18.83 ; J1.P1 83.02,18.83
  L2_PWR w0.381: 81.18,18.83 J1.P1 ; J1.P1 83.02,18.83 ; J1.P1 83.02,20.67 ; J1.P1 81.18,20.67 ; TP4.1 31.96,125.13 ; TP4.1 30.12,123.28 ; TP4.1 31.96,123.28 ; TP4.1 30.12,125.13
  BOTTOM w0.254: J1.4 78.1,19.33 78.1,18.55 v2(78.66,17.99)
  BOTTOM w0.305: U11.8 73.35,118.72 73.24,118.61
  BOTTOM w0.381: 81.18,20.67 J1.P1 ; J1.P1 83.02,18.83 ; J1.P1 81.18,18.83 ; J1.P1 83.02,20.67
  BOTTOM w0.508: 73.24,118.61 v2(73.05,118.42) 72.72,118.09 C7.1 ; R28.1 v2(17.4,127.24) ; R3.1 20.01,132.62 20.78,133.39 21.46,133.39 21.43,133.43 21.43,134.14 21.97,134.68 v2(22.75,134.68) ; v2(84.08,120.12) R10.1 ; R15.2 v2(74.01,130.85) ; R2.1 v2(17.37,129.09) ; D18.2 v2(74.66,88) ; D21.2 v2(74.76,57.11) ; R8.1 v2(71.05,125.79) ; D20.2 v2(74.76,67.03) ; R9.1 v2(74.04,124.88) ; D19.2 v2(74.75,77.83)
  BOTTOM w0.635: U3.6 v2(19.38,85.96)
  vias: v2(30.48,131.03) v2(33.22,131.04) v2(35.73,131.07) v2(36.68,131.68) v2(37.72,131.7) v2(79.02,127.66) v2(81.31,24.41) v2(81.33,23.17) v2(81.36,21.98) v2(82.88,24.34) v2(82.85,23.17) v2(82.85,21.92)
CHASSIS_GND: length 266.5
  TOP w0.762: MH7.1 12.55,6.55 ; MH7.1 7.45,1.45 ; MH7.1 7.45,6.55 ; MH7.1 12.55,1.45 ; 112,8.72 MH4.1 ; MH4.1 112,15.78 ; MH4.1 108.47,12.25 ; MH6.1 107.55,154.95 ; MH6.1 102.45,154.95 ; MH6.1 102.45,160.05 ; MH6.1 107.55,160.05 ; 7.45,154.95 MH5.1 ; MH5.1 12.55,160.05 ; MH5.1 12.55,154.95 ; MH5.1 7.45,160.05 ; MH1.1 6.53,149.25 ; MH1.1 3,145.72 ; MH1.1 3,152.78 ; 102.45,6.55 MH8.1 ; MH8.1 102.45,1.45 ; MH8.1 107.55,6.55 ; MH8.1 107.55,1.45 ; MH2.1 112,152.78 ; MH2.1 108.47,149.25 ; MH2.1 112,145.72 ; MH3.1 6.53,12.25 ; MH3.1 3,15.78 ; MH3.1 3,8.72
  L3_GND w0.762: MH7.1 11.7,2.3 ; MH7.1 8.3,5.7 ; MH7.1 11.7,5.7 ; MH7.1 8.3,2.3 ; MH2.1 112,151.58 ; MH2.1 109.67,149.25 ; MH2.1 112,146.92 ; MH8.1 106.7,2.3 ; MH8.1 103.3,5.7 ; MH8.1 106.7,5.7 ; MH8.1 103.3,2.3 ; 112,9.92 MH4.1 ; MH4.1 109.67,12.25 ; MH4.1 112,14.58 ; MH3.1 3,14.58 ; MH3.1 3,9.92 ; MH3.1 5.33,12.25 ; 3,146.92 MH1.1 ; MH1.1 5.33,149.25 ; MH1.1 3,151.58 ; MH6.1 106.7,159.2 ; MH6.1 103.3,159.2 ; MH6.1 106.7,155.8 ; MH6.1 103.3,155.8 ; 8.3,159.2 MH5.1 ; MH5.1 8.3,155.8 ; MH5.1 11.7,159.2 ; MH5.1 11.7,155.8
  BOTTOM w0.381: MH8.1 107.55,6.55 ; MH8.1 102.45,6.55 ; MH8.1 107.55,1.45 ; MH8.1 102.45,1.45 ; 102.45,154.95 MH6.1 ; MH6.1 107.55,160.05 ; MH6.1 107.55,154.95 ; MH6.1 102.45,160.05 ; 3,145.72 MH1.1 ; MH1.1 6.53,149.25 ; MH1.1 3,152.78 ; MH3.1 6.53,12.25 ; MH3.1 3,15.78 ; MH3.1 3,8.72 ; 7.45,160.05 MH5.1 ; MH5.1 12.55,160.05 ; MH5.1 7.45,154.95 ; MH5.1 12.55,154.95 ; 7.45,1.45 MH7.1 ; MH7.1 12.55,1.45 ; MH7.1 12.55,6.55 ; MH7.1 7.45,6.55 ; MH2.1 112,152.78 ; MH2.1 108.47,149.25 ; MH2.1 112,145.72 ; 108.47,12.25 MH4.1 ; MH4.1 112,8.72 ; MH4.1 112,15.78
DM_RELAY_1: length 172.2
  TOP w0.21: TP19.1 20.16,112.57 16.43,108.84 16.43,54.36 34.57,36.22 75.79,36.22 79.84,32.18 79.84,25.77 v1(78.31,24.24)
  BOTTOM w0.21: J1.5 77.6,20.78 77.6,22.77 78.31,23.47 v1(78.31,24.24) ; TP19.1 41.95,112.61 R17.2
DM_RELAY_2: length 182.2
  TOP w0.21: v1(77.37,24.26) 79.17,26.07 79.17,31.27 76.48,33.96 33.48,33.96 14.99,52.46 14.99,112.07 21.89,118.98 35.75,118.98 TP20.1
  BOTTOM w0.21: TP20.1 46.95,125.02 R19.2 ; v1(77.37,24.26) 77.1,23.99 J1.6
HV_GND: length 5.2
  BOTTOM w0.381: 47.7,116.57 TP18.1 ; TP18.1 49.54,116.57 ; TP18.1 47.7,114.72 ; TP18.1 49.54,114.72
I2C2_SCL: length 178.1
  TOP w0.21: v1(74.19,27.16) 77.34,27.16 77.8,27.61 77.8,29.72 76.81,30.71 31.37,30.71 11.91,50.17 11.91,117.66 v1(24.44,130.18)
  BOTTOM w0.21: R2.2 21.05,130.18 U2.14 v1(24.44,130.18) ; v1(74.19,27.16) 74.19,24.92 75.1,24.01 J1.10
I2C2_SDA: length 176.1
  TOP w0.21: v1(18.75,131.12) 16.41,131.12 8.92,123.63 8.92,47.43 28.07,28.27 v1(75.21,28.27)
  BOTTOM w0.21: U2.15 20.18,130.83 R3.2 v1(18.75,131.12) ; J1.9 75.6,25.04 75.21,25.43 v1(75.21,28.27)
I2C3_SCL: length 140.4
  TOP w0.21: v1(69.55,115.65) 70.84,115.65 71.48,116.29 71.48,118.47 72.83,119.82 73.58,119.82 ; 73.58,119.82 v1(73.58,119.83) ; 73.58,119.82 75.62,119.82 76.72,120.92 v1(76.72,123.82)
  BOTTOM w0.21: U12.6 76.72,127.12 R9.2 v1(76.72,123.82) ; J1.12 79.1,12.09 80.16,11.03 84.02,11.03 88.34,15.35 88.34,28.66 68.14,48.86 68.14,108.45 69.55,109.86 v1(69.55,115.65) ; v1(73.58,119.83) 73.7,119.72 U11.10
I2C3_SDA: length 139.4
  TOP w0.21: v1(70.38,119.05) 72.55,121.22 v1(72.55,125.9)
  BOTTOM w0.21: U12.1 72.57,127.13 R8.2 v1(72.55,125.9) ; J1.11 79.6,12.25 80.26,11.59 83.79,11.59 87.73,15.52 87.73,28.12 67.46,48.39 67.46,109.07 68.91,110.52 68.91,117.58 v1(70.38,119.05) 72.57,119.05 72.74,119.22 U11.9
I2C_ADC_RDY: length 140.5
  TOP w0.21: v1(70.26,114.81) 77.6,114.81 80.57,117.78 v1(80.57,120.12)
  BOTTOM w0.21: v1(70.26,114.81) 70.08,114.63 70.08,108.41 68.66,106.99 68.66,49.92 89.28,29.29 89.28,15.42 84.18,10.32 80.24,10.32 78.64,11.92 78.64,13.51 J1.13 ; R10.2 v1(80.57,120.12) 80.57,119.48 80.31,119.22 U11.2
I2C_ANI0: length 56.4
  BOTTOM w0.21: L18.1 TP10.1 96.14,90.31 99.95,94.11 99.95,110.44 103,113.49 109.32,113.49 110.77,114.94 110.77,126.45 109.21,128 J2.15
I2C_ANI0_IC: length 39.1
  BOTTOM w0.21: R11.2 83.06,118.72 83.34,118.44 83.34,116.08 74.6,107.34 74.6,95.46 TP14.1 D18.1 C19.1 79.1,90.31 79.1,90.31 R31.1 R30.2
I2C_ANI1: length 71.4
  BOTTOM w0.21: J2.16 110.65,130.5 112.19,128.96 112.19,114.25 110.03,112.09 104.34,112.09 102.29,110.04 102.29,84.97 97.45,80.14 TP11.1 L19.1
I2C_ANI1_IC: length 53.3
  BOTTOM w0.21: D19.1 C21.1 R33.1 R32.2 ; D19.1 74.05,80.14 73.18,81.01 73.18,107.47 82.54,116.83 R12.2 ; D19.1 TP15.1
I2C_ANI2: length 84.4
  BOTTOM w0.21: L20.1 TP12.1 102.27,69.33 107.19,74.25 107.19,102.6 112.7,108.11 112.7,130.51 110.21,133 J2.17
I2C_ANI2_IC: length 59.8
  BOTTOM w0.21: R34.2 R35.1 C23.1 D20.1 ; R13.2 71.78,70.23 72.69,69.33 D20.1 ; TP16.1 D20.1
I2C_ANI3: length 98.3
  BOTTOM w0.21: J2.18 110.27,135.5 113.18,132.59 113.18,106.15 110.13,103.1 110.13,65.54 104.01,59.41 TP13.1 L21.1
I2C_ANI3_IC: length 71.9
  BOTTOM w0.21: R36.2 R37.1 C25.1 D21.1 ; R14.2 70.87,116.01 70.87,114.28 70.62,114.03 70.62,61.26 72.47,59.41 D21.1 ; D21.1 TP17.1
I2C_THS_INT: length 183.2
  TOP w0.21: v1(77.7,130.85) 95.95,130.85 100.05,126.75 110.08,126.75 112.62,124.21 112.62,99.12 111.3,97.79 111.3,63.05 106.48,58.22 106.48,20.48 102.64,16.64 91.21,16.64 86.31,11.74 79.55,11.74 77.88,10.06 v1(77.8,10.06)
  BOTTOM w0.21: J1.15 77.6,12.88 77.6,10.26 v1(77.8,10.06) ; U12.4 76.71,130.84 R15.1 v1(77.7,130.85)
IOEXP_INT: length 173.2
  TOP w0.21: v1(77.01,28.63) 76.25,29.39 29.62,29.39 10.36,48.65 10.36,118.37 v1(21.23,129.24)
  BOTTOM w0.21: J1.7 76.6,24.79 77.01,25.2 v1(77.01,28.63) ; U2.13 21.53,129.53 v1(21.23,129.24) 21.23,128.49 R28.2
IOEXP_RESET: length 191.4
  TOP w0.21: v1(36.75,130.18) 35.48,128.91 25.1,128.91 13.16,116.97 13.16,51.62 32.31,32.47 76.68,32.47 78.51,30.64 78.51,26.73 77.62,25.84 v1(76.1,25.84)
  BOTTOM w0.21: U2.3 v1(36.75,130.18) R29.2 ; J1.8 v1(76.1,25.84)
ISO_RELAY1_IN1: length 59
  BOTTOM w0.508: J2.3 104.99,121.31 70.51,121.31 68.33,119.13 68.33,111.79 67.08,110.54 U13.2
ISO_RELAY2_IN1: length 49.8
  BOTTOM w0.508: J2.4 105.66,122.86 U14.2
RELAY1_OUT1: length 15.9
  TOP w0.381: 104.84,136.46 J2.9 ; J2.9 106.76,134.54 ; J2.9 104.84,134.54 ; J2.9 106.76,136.46 ; 27.19,74.56 TP5.1 ; TP5.1 29.04,76.4 ; TP5.1 27.19,76.4 ; TP5.1 29.04,74.56
  BOTTOM w0.381: 27.19,74.56 TP5.1 ; TP5.1 29.04,76.4 ; TP5.1 27.19,76.4 ; TP5.1 29.04,74.56
RELAY1_OUT2: length 16.4
  TOP w0.254: 110.59,115.5 110.59,115.5 J2.10 107.44,115.5 107.39,115.55
  TOP w0.381: 109.76,114.54 J2.10 107.84,114.54 ; TP8.1 22.01,74.56 ; TP8.1 22.01,76.4 ; TP8.1 20.16,76.4 ; TP8.1 20.16,74.56
  BOTTOM w0.381: 20.16,74.56 TP8.1 ; TP8.1 22.01,74.56 ; TP8.1 20.16,76.4 ; TP8.1 22.01,76.4
RELAY2_OUT1: length 15.9
  TOP w0.381: J2.11 109.76,118.96 ; J2.11 107.84,117.04 ; J2.11 109.76,117.04 ; J2.11 107.84,118.96 ; 40.05,76.39 TP6.1 ; TP6.1 41.89,76.39 ; TP6.1 41.89,74.54 ; TP6.1 40.05,74.54
  BOTTOM w0.381: TP6.1 41.89,74.54 ; TP6.1 40.05,76.39 ; TP6.1 41.89,76.39 ; TP6.1 40.05,74.54
RELAY2_OUT2: length 13.1
  TOP w0.381: TP9.1 34.89,74.56 ; TP9.1 34.89,76.4 ; TP9.1 33.05,74.56 ; TP9.1 33.05,76.4 ; 107.84,121.46 J2.12 109.76,121.46
  BOTTOM w0.381: TP9.1 34.89,74.56 ; TP9.1 34.89,76.4 ; TP9.1 33.05,74.56 ; TP9.1 33.05,76.4
RELAY3_OUT1: length 16.2
  TOP w0.254: 104.29,133 104.29,133 J2.8 107.34,133 107.34,133
  TOP w0.381: TP7.1 64.52,79.95 ; TP7.1 62.68,78.1 ; TP7.1 64.52,78.1 ; TP7.1 62.68,79.95 ; 106.76,132.04 J2.8 104.84,132.04
  BOTTOM w0.381: 62.68,79.95 TP7.1 ; TP7.1 64.52,78.1 ; TP7.1 62.68,78.1 ; TP7.1 64.52,79.95
RELAY_1: length 22.3
  BOTTOM w0.635: U5.16 20.96,99.83 22.64,98.15 D24.2 22.64,92 22,91.36 U3.8
RELAY_2: length 31.3
  BOTTOM w0.635: U4.8 34.85,91.36 35.49,92 D25.2 35.49,96.91 34.52,97.87 27.2,97.87 22.23,102.84 U5.15
RELAY_3: length 41
  BOTTOM w0.635: U5.14 23.5,105.87 28.98,100.39 42.7,100.39 48.03,95.05 D26.2 48.99,91.42 U6.8
USB_EN: length 134.5
  TOP w0.21: v1(69.95,107.12) 75.36,107.12 v1(75.39,107.09)
  BOTTOM w0.21: J1.17 76.6,9.2 77.75,8.06 83.49,8.06 91.44,16.01 91.44,30.87 70.14,52.16 70.14,106.92 v1(69.95,107.12) ; U1.4 80.79,106.74 80.44,107.09 v1(75.39,107.09)
USB_OC: length 138.5
  TOP w0.21: v1(76.08,101.99) 76.07,101.99 v1(69.53,101.99)
  BOTTOM w0.21: v1(69.53,101.99) 69.53,51.07 90.32,30.28 90.32,15.65 83.39,8.72 77.98,8.72 77.1,9.59 J1.16 ; U1.5 84.35,106.17 83.24,105.06 83.24,100.89 82.5,100.16 77.83,100.16 77.27,100.71 R1.2 v1(76.08,101.99)
N03287: length 15.8
  BOTTOM w0.21: U5.1 20.96,118.72 25.63,123.39 25.63,127.54 26.97,128.88 U2.5
N03291: length 14.6
  BOTTOM w0.21: U2.6 27.04,128.23 26.24,127.43 26.24,122.64 22.23,118.63 U5.2
N03295: length 13.4
  BOTTOM w0.21: U2.7 27.05,127.58 26.77,127.3 26.77,121.66 23.5,118.39 U5.3
N06560: length 2.8
  BOTTOM w0.21: U11.7 73.98,118.22 R14.1
N06575: length 3.6
  BOTTOM w0.21: U11.6 74.26,117.72 73.71,117.17 73.71,116.18 73.3,115.78 R13.1
N06579: length 2.4
  BOTTOM w0.21: R12.1 81.49,117.72 U11.5
N06583: length 2.5
  BOTTOM w0.21: R11.1 80.8,118.72 80.3,118.22 U11.4
N07201: length 2.6
  BOTTOM w0.635: U3.4 L26.1
N07205: length 2.6
  BOTTOM w0.635: U3.5 21.12,81.21 L25.1
N07536: length 2.6
  BOTTOM w0.635: L23.1 U4.4
N07541: length 2.6
  BOTTOM w0.635: L24.1 U4.5
N08317: length 2.7
  BOTTOM w0.635: U6.4 57.78,83.82 L27.1
N15818: length 24.6
  BOTTOM w0.762: U13.8 60.75,108 59.79,107.04 D22.2 52.91,105.13 48.77,109.27 Q1.4 Q3.2
N16558: length 7
  BOTTOM w0.21: Q1.1 52.91,109.27 51.17,111.01 R17.1
N17913: length 7.1
  BOTTOM w0.21: Q2.1 53.14,121.59 51.28,123.45 R19.1
N17917: length 26.3
  BOTTOM w0.762: D23.2 65.66,118.77 64.12,120.32 U14.8 59.23,120.32 57.68,118.77 51.24,118.77 48.42,121.59 Q2.4 Q4.2
N410547: length 3.1
  BOTTOM w0.21: R30.1 85.22,90.31 C18.1 86.51,90.31 L18.2
N411738: length 3.1
  BOTTOM w0.21: R32.1 C20.1 L19.2
N412167: length 3.1
  BOTTOM w0.21: R34.1 C22.1 L20.2
N412611: length 3.1
  BOTTOM w0.21: L21.2 C24.1 R36.1
N637569: length 5.2
  BOTTOM w0.889: J2.5 L16.2
N652017: length 1.7
  BOTTOM w0.21: Q1.3 R38.2
N652047: length 1.5
  BOTTOM w0.21: Q2.3 R39.2
N652154: length 1.6
  BOTTOM w0.21: R39.1 43.25,120.32 42.62,119.69 Q4.1
N652754: length 1.6
  BOTTOM w0.21: Q3.1 42.84,107.37 R38.1

## Copper pours and planes (outline as drawn; the poured copper is in the pictures)
12V_START1 on BOTTOM (solid shape): 78.26,13.64 78.26,11.38 79.02,10.62 79.4,10.62 79.63,10.39 79.63,9.35 79.38,9.1 78.51,9.1 78.31,9.3 78.31,10.42 77.95,10.77 77.95,13.64 78.03,13.72 78.18,13.72
12V_START1 on L2_PWR: 95.91,100.39 95.91,128.33 96.95,129.37 106.86,129.37 107.47,128.76 107.47,126.95 106.96,126.45 104.32,126.45 103.48,125.61 103.48,22.69 97.07,16.27 91.43,16.27 90.25,15.09 90.25,8.84 88.77,7.37 79.2,7.37 78.28,8.28 78.28,10.01 85.24,16.97 85.24,89.72
+5V USB on BOTTOM: 90.67,105.92 90.57,106.03 90.57,117.72 91.95,119.11 106.73,119.11 107.11,118.72 107.11,117.33 106.58,116.79 97.94,116.79 96.31,115.16 96.31,105.89 95.73,105.31 92.91,105.31 92.3,105.92
GND on TOP: 16.71,152.99 100.38,152.99 107.75,145.62 107.75,137.39 112.22,132.92 112.22,127.94 109.88,127.94 109.88,126.37 106.55,126.37 106.55,124.49 109.88,124.49 109.88,112.5 108.28,112.5 105.33,109.55 105.33,109.53 108.89,109.53 111.68,106.74 111.68,63 106.43,57.74 106.43,21.09 101.8,16.46 91.16,16.46 86.48,11.79 80.11,11.79 79.27,10.95 79.25,10.85 79.32,10.78 79.62,10.58 79.73,10.24 79.57,9.85 79.17,9.68 78.83,9.8 78.63,10.1 78.56,10.17 78.46,10.14 78.3,9.98 78.3,9.97 77.75,9.56 77.29,10.07 77.23,10.16 77.12,10.14 76.56,9.58 76.53,9.47 76.63,9.4 76.81,9.35 76.45,9.35 16.89,9.4 6.32,19.97 6.32,142.6 ; 4 cut-outs
GND on BOTTOM: 106.43,57.74 106.43,17.1 98.73,9.4 14.88,9.4 11.38,12.91 11.39,14.86 9.43,14.85 6.32,17.96 6.32,142.6 16.71,152.99 100.38,152.99 107.75,145.62 107.75,137.39 112.22,132.92 112.22,114.03 108.31,110.11 111.68,106.74 111.68,63 ; 23 cut-outs
GND on BOTTOM: 31.25,135.08 35.41,135.08 35.86,134.62 35.86,133.08 35.38,132.59 29.92,132.59 29.9,132.61 29.9,133.73
GND on BOTTOM: 77.65,79.42 85.7,79.42 85.8,79.32 85.8,78.28 85.63,78.1 77.6,78.1 77.52,78.18 77.52,79.3
GND on BOTTOM: 76.05,126.9 76.05,129.39 75.9,129.54 73.56,129.54 73.36,129.34 73.36,127.92 73.51,127.77 74.32,127.77 74.5,127.59 74.5,126.93 74.57,126.85 76,126.85
GND on BOTTOM: 77.85,68.63 85.45,68.63 85.52,68.55 85.52,67.51 85.32,67.31 77.88,67.31 77.7,67.49 77.7,68.48
GND on BOTTOM: 34.5,115.64 34.85,115.64 34.99,115.51 34.99,112.79 34.75,112.55 31.65,112.55 31.43,112.77 31.43,113.87 29.44,115.86 29.44,118.09 29.77,118.42 31.72,118.42
GND on BOTTOM: 77.78,58.7 85.27,58.7 85.37,58.6 85.37,57.5 85.24,57.38 77.75,57.38 77.6,57.53 77.6,58.52
GND on BOTTOM: 87.5,108.58 89.97,108.58 90.11,108.44 90.12,108.44 90.12,105.85 89.95,105.68 87.44,105.68 87.35,105.77 87.35,108.43
GND on BOTTOM: 79.76,102.66 81.81,102.66 81.95,102.53 81.95,100.84 78.47,100.84 78.39,100.92 78.39,102.42 78.52,102.54 79.64,102.54
GND on BOTTOM: 77.85,89.61 85.6,89.61 85.68,89.53 85.68,88.42 85.55,88.29 77.83,88.29 77.75,88.36 77.75,89.51
GND on L3_GND: 15.95,152.23 102.18,152.23 110.26,144.15 110.26,137.8 111.02,137.04 111.02,114.79 106.43,110.19 106.43,17.1 98.73,9.4 14.88,9.4 6.32,17.96 6.32,142.6 ; 6 cut-outs
VDD1 on TOP: 79.78,22.18 75.18,22.18 74.66,21.66 74.66,18.37 74.28,17.99 70.89,17.99 70.71,17.81 70.71,14.36 70.46,14.1 53.98,14.1 53.8,14.28 53.8,21.95 53.09,22.66 48.67,22.66 47.52,21.52 47.52,11.69 49.5,9.71 76.15,9.71 76.91,10.47 76.91,20.3 77.19,20.58 79.65,20.58 79.91,20.83 79.91,22.05
VDD1 on BOTTOM: 60.63,116.95 60.25,116.57 60.25,114.71 60.83,114.13 67.46,114.13 67.61,114.28 67.61,116.72 67.39,116.95
VDD1 on BOTTOM: 65.86,129.04 61.42,129.04 60.99,128.6 60.99,126.52 61.32,126.19 62.43,126.19 62.46,126.22 65.63,126.22 66.29,126.88 66.29,128.6
VDD1 on BOTTOM: 50.06,9.63 47.5,12.2 47.5,86.16 44.45,89.21 25.07,89.21 24.51,89.77 24.51,95.41 25.27,96.17 29.87,96.17 31.34,94.7 31.34,91.39 32.16,90.58 37.49,90.58 38.15,91.24 38.15,95.25 38.46,95.56 38.46,95.57 41.66,95.57 41.67,95.58 45.09,95.58 45.87,94.8 45.87,91.04 47.07,89.84 52.78,89.84 53.54,90.61 53.54,96.63 48.97,101.2 30.25,101.2 29.54,101.91 29.54,112.63 29.72,112.81 30.63,112.81 31.34,112.09 38.1,112.09 38.53,111.66 38.53,107.34 39.34,106.53 50.24,106.53 54.48,102.29 61.09,102.29 61.52,101.86 61.52,88.22 61.06,87.76 56.16,87.76 54.41,86.01 54.41,13.95 56.72,11.64 70.41,11.64 71.02,12.25 71.02,14.84 71.65,15.47 73.81,15.47 74.47,14.81 74.47,10.98 73.13,9.63
VDD1 on L2_PWR: 38.99,85.65 40.11,84.54 61.16,84.54 65.46,88.83 65.46,132.08 63.17,134.37 61.75,134.37 61.72,134.35 41.72,134.35 38.99,131.62
VDD2 on TOP: 74.78,22.53 79.48,22.53 79.68,22.74 79.68,23.45 79.5,23.63 76.61,23.63 73.63,26.6 56.62,26.6 55.7,25.68 55.7,20.96 57.28,19.38 70.05,19.38 71.04,18.39 73.96,18.39 74.32,18.75 74.32,22.08
VDD2 on BOTTOM: 81.69,105.33 79.78,105.33 79.48,105.64 79.48,106.48 79.27,106.68 76.61,106.68 76.41,106.48 76.41,103.25 76.69,102.97 81.51,102.97 81.87,103.33 81.87,105.15
VDD2 on BOTTOM: 25.65,87.13 25.3,86.77 25.3,85.5 25.48,85.32 42.06,85.32 42.29,85.55 42.29,86.29 42.28,86.3 42.28,86.94 42.09,87.13
VDD2 on BOTTOM: 57.2,21.77 57.2,21.77 64.16,21.77 64.62,22.23 64.62,27 64.19,27.44 55.32,27.44 54.86,26.98 54.86,22.28 55.37,21.77
VDD2 on L2_PWR: 38.02,87.56 24.26,87.56 23.83,87.13 23.83,30.79 33.73,20.88 67.92,20.88 70.49,18.32 75.16,18.32 79.68,22.84 79.68,53.78 78.16,55.3 73.58,55.3 72.95,55.94 72.95,89.21 80.06,96.32 80.06,110.06 79.32,110.8 66.7,110.8 66.29,110.39 66.29,88.68 61.47,83.85 39.73,83.85 38.46,85.12 38.46,87.13
VDD3 on TOP: 80.49,20.86 79.93,20.3 77.62,20.3 77.22,19.89 77.22,17.48 77.5,17.2 83.24,17.2 84.89,18.85 84.89,28.3 84.35,28.83 80.95,28.83 80.49,28.38
VDD3 on BOTTOM: 76.45,128.48 76.4,128.43 76.4,127.75 76.53,127.62 77.29,127.62 77.6,127.31 79.25,127.31 79.38,127.44 79.38,128.4 79.29,128.48
VDD3 on BOTTOM: 84.87,22.77 84.86,22.76 84.86,20.1 83.08,18.32 80.95,18.32 80.24,19.03 80.24,28.86 80.44,29.06 84,29.06 84.87,28.19
VDD3 on BOTTOM: 27.72,131.26 27.76,131.21 29.64,131.21 30.09,130.76 37.24,130.76 37.64,131.17 39.75,131.17 39.93,131.35 39.93,132.24 39.67,132.49 36.12,132.49 35.88,132.26 28.83,132.26 28.82,132.25 28.03,132.25 27.72,131.93
VDD3 on BOTTOM: 24.23,135.49 21.87,135.49 20.88,134.5 20.88,131.37 21.11,131.14 23.5,131.14 23.62,131.27 23.62,131.68 22.99,132.31 22.99,133.91 23.22,134.14 24.31,134.14 24.51,134.35 24.51,135.21
VDD3 on L2_PWR: 14.22,153.42 83.57,153.42 93.19,143.79 93.19,101.25 84.76,92.82 84.76,17.28 74.27,6.79 30.96,6.79 8.56,29.19 8.56,147.76 ; 1 cut-out
CHASSIS_GND on TOP: 0.51,0.51 0.51,160.99 114.49,160.99 114.49,0.51 ; 4 cut-outs
CHASSIS_GND on BOTTOM: 0.51,160.99 114.49,160.99 114.49,0.51 0.51,0.51 ; 2 cut-outs
CHASSIS_GND on L3_GND: 0.51,0.51 0.51,160.99 114.49,160.99 114.49,0.51 ; 1 cut-out
HV_GND on BOTTOM: 41.96,117.05 57.73,117.05 58.06,116.71 58.06,113.69 57.6,113.24 52.39,113.24 51.89,113.74 46.79,113.74 46.78,113.74 37.95,113.74 35.05,116.64 35.05,126.01 38.47,129.43 41.2,129.43 46.65,134.88 97.1,134.88 99.57,132.41 99.57,124.82 99.31,124.57 98.09,124.57 97.87,124.79 97.87,130.99 96.29,132.57 59.82,132.57 58.04,130.79 58.04,126.98 57.43,126.37 41.1,126.37 39.65,124.92 39.65,119.36
RELAY1_OUT1 on TOP: 106.43,137.65 54.48,137.65 49.81,132.97 49.81,89.08 45.97,85.25 25.3,85.25 24.31,84.26 24.31,74.71 26.04,72.98 29.06,72.98 30.2,74.12 30.2,80.62 30.94,81.36 53.62,81.36 57.2,84.94 57.2,131.3 60.05,134.14 106.83,134.14 107.44,134.75 107.44,136.63
RELAY1_OUT1 on BOTTOM: 25.38,74.35 25.38,80.02 25.61,80.25 27.54,80.25 29.56,80.25 29.9,79.91 29.9,74.55 29.31,73.97 25.76,73.97
RELAY1_OUT2 on TOP: 27.79,49.1 101.4,49.1 103.73,51.44 103.73,108.21 108.15,112.63 110.26,112.63 111,113.36 111,116.23 110.74,116.49 107.37,116.49 107.19,116.31 107.19,114.66 106.73,114.2 99.01,114.2 97.38,112.58 97.38,59.29 94.18,56.09 30.68,56.09 23.11,63.66 23.11,77.27 22.34,78.05 20.05,78.05 19.23,77.22 19.23,57.66
RELAY1_OUT2 on BOTTOM: 18.98,74.17 18.98,79.84 19.21,80.07 21.14,80.07 23.16,80.07 23.5,79.74 23.5,74.38 22.91,73.79 19.35,73.79
RELAY2_OUT1 on TOP: 39.12,76.48 39.12,69.27 43.26,65.13 76.43,65.13 76.48,65.08 88.44,65.08 91.52,68.15 91.52,110.11 98.04,116.64 110.72,116.64 110.92,116.84 110.92,119.11 110.62,119.41 94.13,119.41 85.67,110.95 85.67,71.23 84.07,69.63 50.85,69.63 47.9,72.57 47.9,75.62 46.43,77.09 39.73,77.09
RELAY2_OUT1 on BOTTOM: 39.4,74.09 39.4,79.77 39.63,79.99 41.56,79.99 41.56,79.99 43.58,79.99 43.92,79.66 43.92,74.3 43.33,73.72 39.78,73.72
RELAY2_OUT2 on TOP: 32.94,73.23 37.77,73.23 38.28,73.74 38.28,76.79 39.07,77.58 47.45,77.58 49.02,76 49.02,73.11 51.46,70.67 80.11,70.67 82.91,73.46 82.91,110.85 92.96,120.91 106.76,120.91 108,119.66 110.54,119.66 111.02,120.15 111.02,123.7 110.49,124.24 89.41,124.24 77.72,112.55 77.72,77.12 76.02,75.42 59.31,75.42 57.38,77.35 57.38,79.43 56.31,80.5 34.21,80.5 32.44,78.72 32.44,73.74
RELAY2_OUT2 on BOTTOM: 32.19,74.12 32.19,79.79 32.41,80.02 34.35,80.02 36.37,80.02 36.7,79.68 36.7,74.32 36.12,73.74 32.56,73.74
RELAY3_OUT1 on TOP: 107.32,133.96 66.57,133.96 60.1,127.49 60.1,77.58 61.04,76.64 65.23,76.64 66.9,78.31 66.9,127.23 71.3,131.63 107.29,131.63 107.7,132.03 107.7,133.58
RELAY3_OUT1 on BOTTOM: 61.6,86.04 61.83,86.27 63.76,86.27 65.78,86.27 66.12,85.93 66.12,80.57 66.1,80.56 66.1,76.65 65.53,76.08 62.2,76.08 61.6,76.68
N13136 on BOTTOM: 85.08,105.32 92.05,105.32 92.05,102.49 91.42,101.85 85.24,101.85 84.94,102.16 84.94,105.18

## Text on the board
BOTTOM: L4
Ref Des/Silkscreen Bottom: PCB_SB_V2.1
User.Comments: UNLESS OTHERWISE SPECIFIED | ALL DIMENSIONS ARE IN | INCHES | DATE | MILLIMETERS | SIZE | SCALE | DRAWING TITLE | PART NUMBER | 1/1 | SHEET | 1  OF | REV | 1 | 14/09/2021 | 2.1 | D | SIENNA ECAD Technologies | X
TOP: L1
Ref Des/Silkscreen Top: P2 | P4 | P3 | P1
L2_PWR: L2
L3_GND: L3
FAB_NOTES: NOTES: UNLESS OTHERWISE SPECIFIED. | 11. REQUEST FABRICATOR TO ADD TEAR DROPS IF NOT ADDED IN THE GERBERS. | 12. PREFERRED LAMINATE/PREPREG  FR4  OR FABRICATOR SHALL | 14.IF THE BOARD SIZE IS IRREGULAR (OTHER THAN SQUARE/RECTANGLE), EDGE PCB | 15. KINDLY PROVIDE 5MM HANDLING AREA ON ALL SIDES, 4 MOUNTING HOLES AND 3 GLOBAL | 10. MINIMUM CONDUCTOR WIDTH:8.26MIL | REQUIREMENTS. | COPPER: AS PER STACKUP. | 2. MATERIAL:. | DIELECTRIC:  FR4 PER IPC-4101 WITH MIN TG 180 DEG C. | U.L. RATING: 94V-0 MINIMUM | 13. IF THE BOARD SIZE IS LESS THAN 50 X 50 MM, IT SHOULD BE IN A PANEL | 1. FABRICATE PER IPC-6012A CLASS 2. | 6. 100% CONTINUITY TESTING USING DATABASE NETLIST SHALL BE PERFORMED, | VENDOR TO IDENTIFY TEST PASSED IN SECONDARY  SIDE. | 4. SOLDER MASK MATERIAL SHALL MEET ALL THE REQUIREMENTS OF | IPC-SM-840C AND SHALL BE GREEN IN COLOR AND APPLIED OVER BARE COPPER. | 7. VENDOR TO MARK DATE CODE AND LOGO  IN ETCH OR IN LEGEND. | 3. SURFACE FINISH:  ( ENIG ) | 5. SILK SCREEN LEGEND TO BE APPLIED PER LAYER STACKUP USING WHITE | NON-CONDUCTIVE EPOXY INK. | 9. DIELECTRICS AND LINEWIDTHS MAY BE ADJUSTED TO MEET THE IMPEDANCE | 8. BOW AND TWIST SHALL NOT EXCEED 0.7% OF LONGEST SIDE . | FORM FOR ASSEMBLY PURPOSE. | WITH BREAKAWAY TABS SHOULD BE THERE IN MINIMUM 2 SIDES WITH 5 MM HANDLING AREA. | FIDUCIALS , BREAK AWAY TABS OR V-CUT TO BREAK PCB AFTER ASSEMBLY. | USE EQUIVALENT OF THE PREFERRED MATERIAL. | MINIMUM SPACING:7.00MIL | FABRICATION DRAWING | PCB_SB_V2.1 | SENSITIVE ELECTRONIC DEVICES-CLASS 1 | CAUTION
PAGE_OUTLINE: 64.446Mils +/- 10% | 1.6353 MM +/- 10% | SECONDARY SIDE, SILK SCREEN | PRIMARY SIDE, SILK SCREEN | PRIMARY SIDE, SOLDER MASK----2MIL | PRIMARY SIDE, LAYER 1----2.067MIL | SECONDARY SIDE, LAYER 4----2.067MIL | SECONDARY SIDE, SOLDER MASK----2MIL | DIELECTRIC----5MIL | DIELECTRIC----43.792MIL | INNER PLANE LAYER, LAYER 3----1.260MIL | INNER PLANE LAYER, LAYER 2----1.260MIL | CAD | DATA | DO NOT MANUALLY | UPDATE | D | C | B | A | 8 | 7 | 6 | 5 | 4 | 3 | 2 | 1
DXF_20210528-01: 161.50 | 153.50 | 137.00 | 115.00 | 109.00 | 95.00 | 16.70 | [BOARD EDGE TO CONNECTOR CENTER] | 10.00 | 37.65 | SAME DISTANCE OUT AS CONNECTOR ON CARRIER BOARD | 4.00 | 36.00
User.6: LAYER NO. | LAYER 1 | LAYER 4 | CONDUCTOR WIDTH | 8.260 MILS | SINGLE ENDED | REFERENCE LAYER | 2 | 3 | IMPEDANCE +/-10% | 50-ohm +/-10%
User.7: DATE: | DESIGNED AT:SIENNA ECAD TECHNOLOGIES | PART NO/CARD REF: | FILM LAYER: | 14-09-2021 | EMBITEL | PCB_SB_V2.1 | JOB NUMBER: | EMBL51745 | REV: | 2.1
User.8: PRIMARY SIDE
User.9: LAYER 2_PWR
User.10: FABRICATION LAYER
User.11: SOLDERMASK PRIMARY SIDE
User.12: SOLDERMASK SECONDARY SIDE
User.13: SOLDER PASTE PRIMARY SIDE
User.14: SOLDER PASTE SECONDARY SIDE
User.15: ASSEMBLY PRIMARY SIDE
User.16: ASSEMBLY SECONDARY SIDE
User.17: SILKSCREEN PRIMARY SIDE
User.18: SILKSCREEN SECONDARY SIDE
User.19: LAYER 3_GND
User.20: SECONDARY SIDE
User.21: ESWAR
User.23: FIGURE | FINISHED_SIZE | 12.0 | 39.37 | 43.307 | 47.244 | 125.984 | DRILL CHART: TOP to BOTTOM | ALL UNITS ARE IN MILS | TOLERANCE_DRILL | +3.0/-3.0 | +2.0/-2.0 | PLATED | NON-PLATED | QTY | 137 | 24 | 18 | 4 | 8 | 2
